# Altium PCB Side_PCB.PcbDoc
Units mm, origin at the board's own origin, x right, y up, seen from the top; angles counter-clockwise.
Board outline 42 x 20 mm, 2 copper layers (Top Layer, Bottom Layer), stack 1.448 mm thick; 12 components, 6 nets, 51 pads, 47 vias.
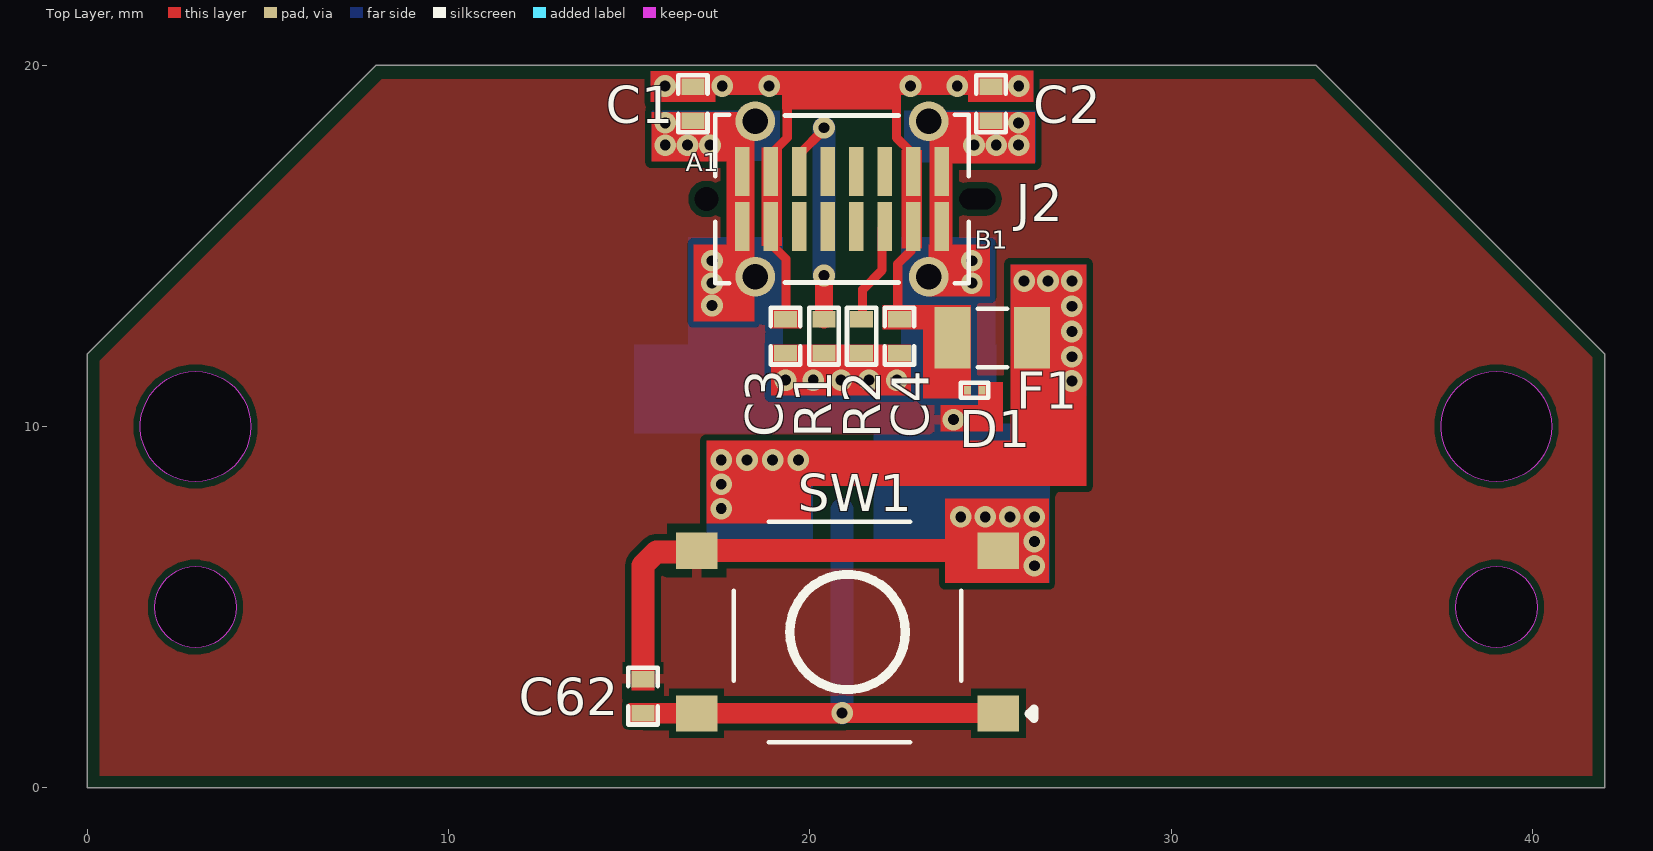
[diagram p0: Top Layer view]
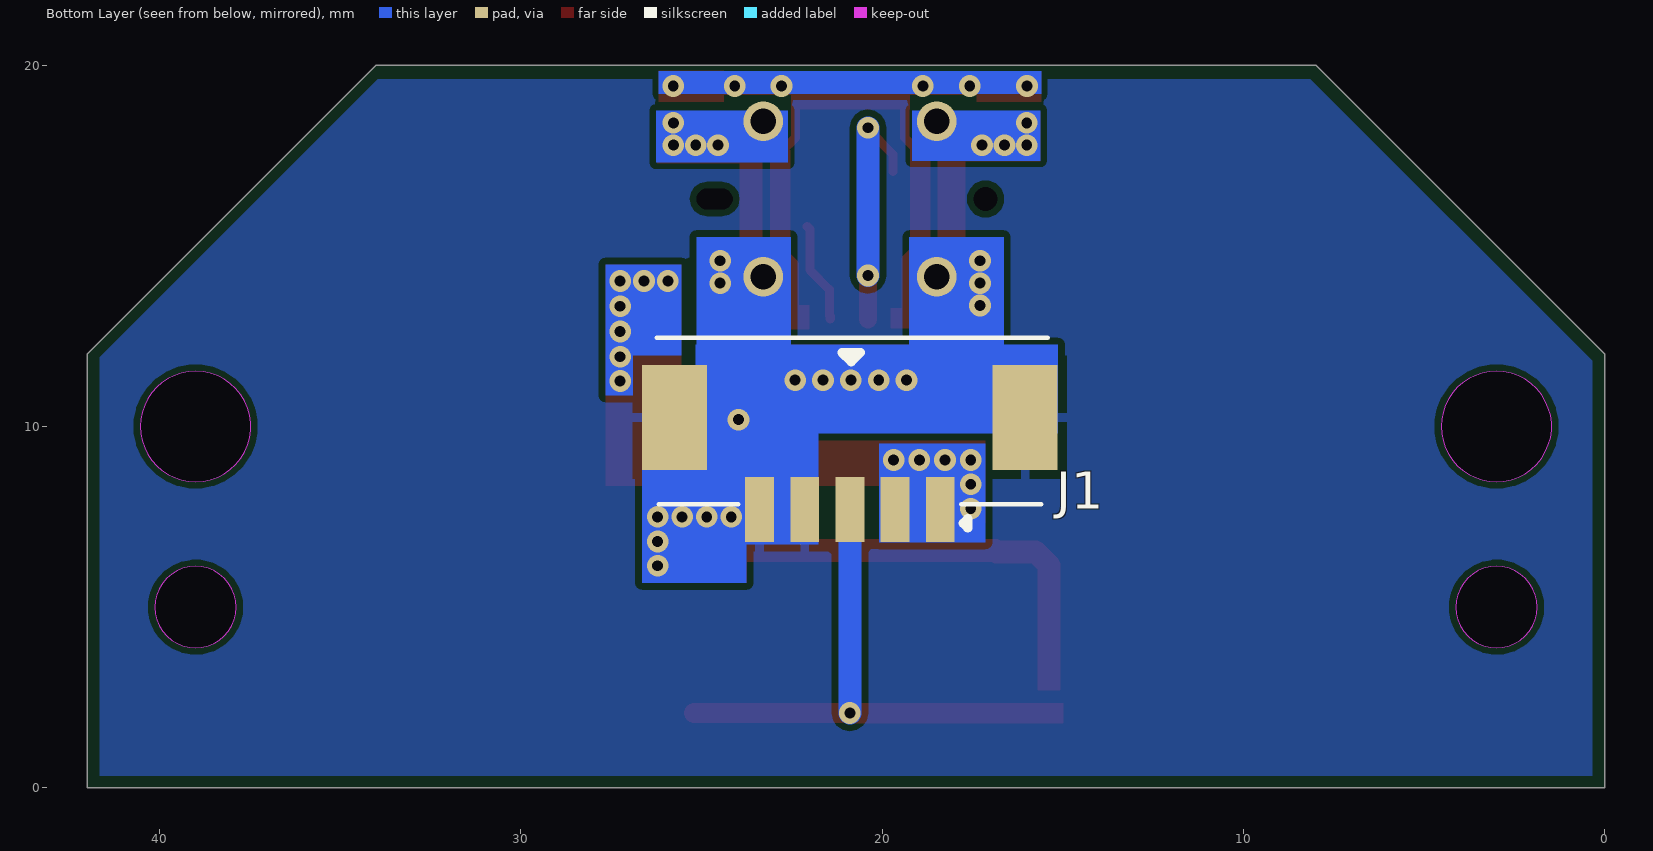
[diagram p1: Bottom Layer view, seen from below]
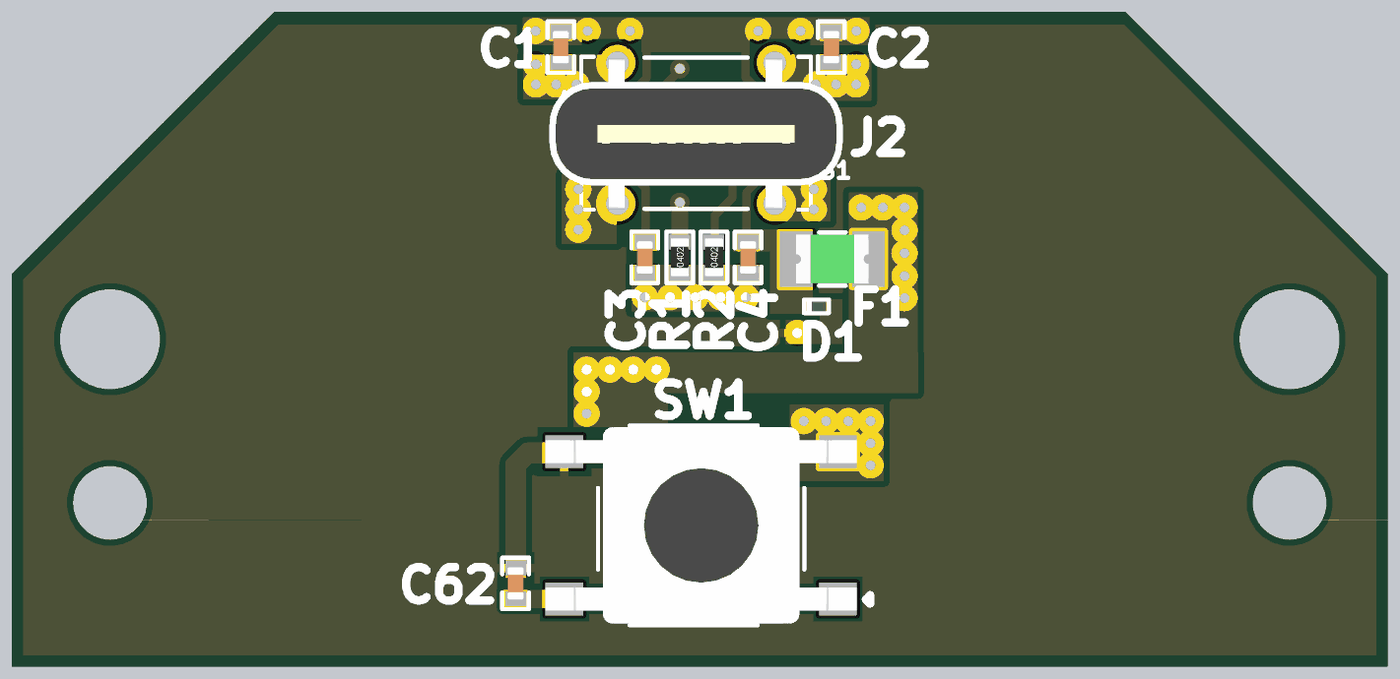
[diagram p2: 3D render of the assembled board from above, using the file's embedded part models]

## Layer stack, top to bottom
Top Solder: solder mask 0.0762, Solder Resist, Dk 3.5
Top Layer: signal copper 0.254
Dielectric 1: dielectric 0.9398, FR-4, Dk 4.8
Bottom Layer: signal copper 0.254
Bottom Solder: solder mask 0.0762, Solder Resist, Dk 3.5

## Board outline
0,0 42,0 42,12 34,20 8,20 0,12
cut-out: 39,3.873 cw(c39,5) 39,6.127 cw(c39,5) 40.127,5 cw(c39,5)
cut-out: 39,8.473 cw(c39,10) 39,11.527 cw(c39,10) 40.527,10 cw(c39,10)
cut-out: 3,3.873 cw(c3,5) 3,6.127 cw(c3,5) 4.127,5 cw(c3,5)
cut-out: 3,8.473 cw(c3,10) 3,11.527 cw(c3,10) 4.527,10 cw(c3,10)

## Design rules (kind name [scope] priority, off if disabled: settings)
Clearance [All] p1: gap=0.178 ignorepadtopadclearanceinfootprint=FALSE except(0: Arc-Hole Track-Hole SMDPad-Hole THPad-Hole Via-Hole Fill-Hole Poly-Hole Region-Hole Text-Hole; 0.102: Arc-SMDPad Track-SMDPad SMDPad-SMDPad)
ComponentClearance [All] p1: gap=0 collisioncheckmode=3 verticalgap=0 showdistances=FALSE
HoleToHoleClearance [All] p1: gap=0 allowstackedmicrovias=TRUE
MinimumSolderMaskSliver [All] p1: minsoldermaskwidth=0
PolygonConnect [All] p1: connectstyle=Relief reliefconductorwidth=0.254 reliefentries=4 polygonreliefangle="90 Angle" airgapwidth=0.254
RoutingVias [All] p1: holewidth=0.3 width=0.6 viastyle="Through Hole" minholewidth=0.3 minwidth=0.6 maxholewidth=0.3 maxwidth=0.6
SilkToSilkClearance [All] p1: silktosilkclearance=0
SilkToSolderMaskClearance [IsPad] p1: minsilkscreentomaskgap=0 clearancetoexposedcopper=TRUE
SolderMaskExpansion [All] p1: expansion=0.102 istentingtop=FALSE
Width [All] p1: maxlimit=1.016 minlimit=0.254 preferedwidth=0.559
25 further rules are at their usual default settings.

## Components (designator, comment, footprint, x,y, rotation, side; value= is the part's Value field where it differs from the comment)
C1 "1nF" Cap-0402 16.76,18.928 r270 top
C2 "1nF" Cap-0402 25.015,18.928 r270 top
C3 "1nF" Cap-0402 19.325,12.502 r270 top locked
C4 "1nF" Cap-0402 22.475,12.502 r270 top locked
C62 "100nF" Cap-0402 15.38,2.54 r270 top
D1 "PESD5V0H1BSFYL" DSN0603-2 24.561,11.003 r0 top locked
F1 "BSMD0805L-200" Fuse-0805 25.048,12.451 r0 top locked
J1 "1.25-5PWB" 1.25-5PWB 20.892,8.976 r0 bottom
J2 "918-418K2022Y40009" 918-418K2022Y40009 20.888,16.295 r0 top locked
R1 "5.1K" Res-0402 20.392,12.502 r90 top locked
R2 "5.1K" Res-0402 21.434,12.502 r90 top locked
SW1 "K2-1102SP-C4SC-04" K2-1102SP-C4SC-04 21.043,4.312 r180 top

## Footprints (in the part's own frame and the unit in brackets; to place one, negate y for a bottom-side part, rotate by r counter-clockwise, add the part's x,y. Pads: shape width x height; smd on the part's side, far side on the other; paste and mask are expansions set on the pad)
1.25-5PWB [mm]
  rect 0.8x1.8 smd: 1(-2.5,1.275) 2(-1.25,1.275) 3(0,1.275) 4(1.25,1.275) 5(2.5,1.275)
  rect 1.8x2.9 smd: MP1(-4.85,-1.275) MP2(4.85,-1.275)
  silkscreen extent -5.47,-3.47 5.35,1.78, body extent -5.5,-4.32 5.5,1.73, height 3.56
918-418K2022Y40009 [mm]
  rect 0.4x1.35 smd: A1(-2.765,0.76) A4(-1.975,0.76) A5(-1.185,0.76) A6(-0.395,0.76) A7(0.395,0.76) A8(1.185,0.76) A9(1.975,0.76) A12(2.765,0.76) B1(2.765,-0.76) B4(1.975,-0.76) B5(1.185,-0.76) B6(0.395,-0.76) B7(-0.395,-0.76) B8(-1.185,-0.76) B9(-1.975,-0.76) B12(-2.765,-0.76)
  round 0 hole 0.58 slot 1 at 0 deg unplated: MH(3.75,0)
  round 0 hole 0.66 unplated: MH2(-3.75,0)
  round 1.1 hole 0.7: S1(-2.4,2.15) S2(2.4,2.15) S3(2.4,-2.15) S4(-2.4,-2.15)
  silkscreen extent -3.51,-2.34 3.51,2.34, body extent -4.47,-2.31 4.47,2.29, height 10.56
Cap-0402 [mil]
  rect 18x25 smd mask+2.36: 1(-18.5,0) 2(18.5,0)
  silkscreen extent -31,-16 31,16, body extent -20,-10 20,10, height 19
DSN0603-2 [mm]
  rect 0.2x0.24 smd mask+0.055: 1(-0.2,0) 2(0.2,0)
  silkscreen extent -0.38,-0.2 0.38,0.2, body extent -0.3,-0.15 0.3,0.15, height 0.32
Fuse-0805 [mm]
  rect 1x1.7 smd: 1(-1.1,0) 2(1.1,0)
  silkscreen extent -0.41,-0.81 0.41,0.81, body extent -1.1,-0.75 1.1,0.75, height 1.24
K2-1102SP-C4SC-04 [mm]
  rect 1.15x1 smd: 1(-4.175,2.25) 2(4.175,2.25) 3(-4.175,-2.25) 4(4.175,-2.25)
  silkscreen extent -5.16,-3.05 3.15,3.05, body extent -4.75,-3 4.75,3, height 5.07
Res-0402 [mil]
  rect 18x25 smd mask+2.17: 1(-18.5,0) 2(18.5,0)
  silkscreen extent -32,-17 32,16, body extent -23,-11 23,11, height 16

## Part data
C1 C2 C3 C4: library part C1005C0G1E102JT000F, "CAP CER 1000PF 25V C0G 0402", LCSC Part Number=C343059, Manufacturer=TDK, Package=0402, ComponentLink1Description=LCSC, ComponentLink1URL=https://www.lcsc.com/product-detail/Multilayer-Ceramic-Capacitors-MLCC-SMD-SMT_TDK-C1005C0G1E102JT000F_C343059.html, Item Type=Capacitor, Manufacturer Part Number=C1005C0G1E102JT000F
C62: library part CC0402KRX5R8BB104, "CAP CER 0.1UF 25V X5R 0402", Case Code (Imperial)=0402, Case Code (Metric)=1005, Dielectric=X5R, LCSC Part Number=C106256, Manufacturer=Yageo, Max Operating Temperature=85°C, Min Operating Temperature=-55°C, Resistor Type=Ceramic, Supplier Part Number 1=311-1697-1-ND, Tolerance=10%, Voltage Rating=25V, Capacitance=100nF, Case/Package=0402, Category="Ceramic Capacitors", ComponentLink1Description=http://www.mouser.com/ds/2/447/UPY-GPHC_X5R_4V-to-50V_25-1131599.pdf?src-supplier=Mouser, ComponentLink1URL=http://www.mouser.com/ds/2/447/UPY-GPHC_X5R_4V-to-50V_25-1131599.pdf?src-supplier=Mouser, ComponentLink2Description=http://www.yageo.com/documents/recent/UPY-GPHC_X5R_4V-to-50V-16.pdf?src-supplier=Future+Electronics, ComponentLink2URL=http://www.yageo.com/documents/recent/UPY-GPHC_X5R_4V-to-50V-16.pdf?src-supplier=Future+Electronics, ComponentLink3Description=http://www.yageo.com/documents/recent/UPY-GPHC_X5R_4V-to-50V_25.pdf?src-supplier=Digi-Key, ComponentLink3URL=http://www.yageo.com/documents/recent/UPY-GPHC_X5R_4V-to-50V_25.pdf?src-supplier=Digi-Key, Depth=0.5mm, Halogen Free="Halogen Free", Item Type=Capacitor, Lead Free="Lead Free", Length=0.039inch, Manufacturer Part Number=CC0402KRX5R8BB104, Mount="Surface Mount", Packaging="Tape and Reel", Pricing 1="1=0.10000, 10=0.03800, 50=0.02100, 100=0.01710, 500=0.01224, 1000=0.00961, 2500=0.00874, 5000=0.00804 (USD)", RoHS=Yes, RoHS Compliant=Yes, Series=CC, Stock 1=4598218, Supplier 1=Digi-Key, Thickness=0.022inch, Voltage Rating (DC)=25V, Width=0.02inch
D1: "TVS DIODE 5VWM 6.3VC DSN0603-2", LCSC Part Number=C477989, Manufacturer=Nexperia, Category="ESD and Circuit Protection ICs", ComponentLink1Description=http://www.farnell.com/datasheets/1961312.pdf?src-supplier=Farnell, ComponentLink1URL=http://www.farnell.com/datasheets/1961312.pdf?src-supplier=Farnell, ComponentLink2Description=https://assets.nexperia.com/documents/data-sheet/PESD5V0H1BSF.pdf?src-supplier=Digi-Key, ComponentLink2URL=https://assets.nexperia.com/documents/data-sheet/PESD5V0H1BSF.pdf?src-supplier=Digi-Key, ComponentLink3Description=http://www.farnell.com/datasheets/1961312.pdf?src-supplier=Newark, ComponentLink3URL=http://www.farnell.com/datasheets/1961312.pdf?src-supplier=Newark, Item Type=Diode, Manufacturer Part Number=PESD5V0H1BSFYL, Pricing 1="18000=0.06453, 36000=0.06278, 54000=0.06104, 90000=0.05930, 180000=0.05755, 900000=0.05581, 1800000=0.05406 (USD)", RoHS=Yes, RoHS Compliant=Yes, Stock 1=9000, Supplier 1=Avnet, Supplier Part Number 1=PESD5V0H1BSFYL
F1: "6V 2A 50A 1W -40℃~+85℃ 4A 4mΩ 5s 45mΩ 0805 Resettable Fuses ROHS", LCSC Part Number=C2757931, Manufacturer=BHFUSE, Package=0805, ComponentLink1Description=LCSC, ComponentLink1URL=https://www.lcsc.com/product-detail/Resettable-Fuses_BHFUSE-BSMD0805L-200_C2757931.html, Item Type=Fuse, Manufacturer Part Number=BSMD0805L-200
J1: "1x5P 1 1.25mm Male pin 5 -25℃~+85℃ Surface Mount SMD,P=1.25mm Wire To Board / Wire To Wire Connector ROHS", LCSC Part Number=C2905012, Manufacturer=DEALON, Package=SMD,P=1.25mm, ComponentLink1Description=LCSC, ComponentLink1URL=https://www.lcsc.com/product-detail/Wire-To-Board-Wire-To-Wire-Connector_DEALON-1-25-5PWB_C2905012.html, Item Type="JST Right Angle", Manufacturer Part Number=1.25-5PWB
J2: "USB 3.1 1 Brick nogging 16 Female Type-C SMD USB Connectors ROHS", LCSC Part Number=C2763102, Manufacturer="Jing Extension", Package=Custom, ComponentLink1Description=LCSC, ComponentLink1URL=https://www.lcsc.com/product-detail/USB-Connectors_Jing-Extension-of-the-Electronic-Co-918-418K2022Y40009_C2763102.html, Item Type="USB Connector", Manufacturer Part Number=918-418K2022Y40009
R1 R2: library part RC0402FR-075K1L, "RES 5.1K OHM 1% 1/16W 0402", Case Code (Imperial)=0402, Case Code (Metric)=1005, LCSC Part Number=C137973, Manufacturer=Yageo, Max Operating Temperature=155°C, Max Power Dissipation=63mW, Min Operating Temperature=-55°C, Package Quantity=1, Resistance=5.1kR, Resistance Tolerance=1%, Resistor Type="Thick Film", Temperature Coefficient=100ppm/°C, Voltage Rating=50V, Case/Package=0402, Category="Chip SMD Resistors", ComponentLink1Description=https://datasheet.ciiva.com/7983/1018594-7983519.pdf?src-supplier=Element14, ComponentLink1URL=https://datasheet.ciiva.com/7983/1018594-7983519.pdf?src-supplier=Element14, ComponentLink2Description=https://datasheet.ciiva.com/46394/1018594-46394936.pdf?src-supplier=Element14, ComponentLink2URL=https://datasheet.ciiva.com/46394/1018594-46394936.pdf?src-supplier=Element14, ComponentLink3Description=https://datasheet.ciiva.com/2453/pyu-r-int-thick-7-2453401.pdf?src-supplier=Digi-Key, ComponentLink3URL=https://datasheet.ciiva.com/2453/pyu-r-int-thick-7-2453401.pdf?src-supplier=Digi-Key, ComponentLink4Description=https://datasheet.ciiva.com/2453/pyu-r-int-thick-7-2453402.pdf?src-supplier=Digi-Key, ComponentLink4URL=https://datasheet.ciiva.com/2453/pyu-r-int-thick-7-2453402.pdf?src-supplier=Digi-Key, ComponentLink5Description=https://datasheet.ciiva.com/2453/pyu-r-int-thick-7-2453400.pdf?src-supplier=Digi-Key, ComponentLink5URL=https://datasheet.ciiva.com/2453/pyu-r-int-thick-7-2453400.pdf?src-supplier=Digi-Key, ComponentLink6Description=https://datasheet.ciiva.com/12558/pyu-rc0402-51-rohs-l-6-r-8721-12558460.pdf?src-supplier=Mouser, ComponentLink6URL=https://datasheet.ciiva.com/12558/pyu-rc0402-51-rohs-l-6-r-8721-12558460.pdf?src-supplier=Mouser, ComponentLink7Description=https://datasheet.ciiva.com/16744/pyu-rc0402-51-rohs-l-6-r-16744283.pdf?src-supplier=Future+Electronics, ComponentLink7URL=https://datasheet.ciiva.com/16744/pyu-rc0402-51-rohs-l-6-r-16744283.pdf?src-supplier=Future+Electronics, ComponentLink8Description=https://datasheet.ciiva.com/15189/getdatasheetpartid-323636-15189493.pdf?src-supplier=Verical, ComponentLink8URL=https://datasheet.ciiva.com/15189/getdatasheetpartid-323636-15189493.pdf?src-supplier=Verical, Construction=Rectangular, Depth=0.5mm, Features="Moisture Resistant", Height=0.016inch, Item Type=Resistor, Lead Free="Lead Free", Length=1mm, Manufacturer Part Number=RC0402FR-075K1L, Military Standard=Not, Number of Terminations=2, Packaging="Tape and Reel", Power Rating=63mW, Pricing 1="10000=0.00085 (USD)", RoHS=Yes, RoHS Compliant=Yes, Series=RC, Stock 1=65000, Supplier 1=Avnet, Supplier Part Number 1=RC0402FR-075K1L, Technology="THICK FILM", Termination=SMD/SMT, Tolerance=1%, Voltage Rating (DC)=50V, Width=0.02inch, Working Voltage=50V
SW1: "-25℃~+85℃ 6mm 5mm Round Button 50mA Brick nogging 6mm SPST 100MΩ 100000 250gf@±30gf 12V SMD Tactile Switches ROHS", LCSC Part Number=C127509, Manufacturer="Korean Hroparts Elec", Package=SMD, ComponentLink1Description=LCSC, ComponentLink1URL=https://www.lcsc.com/product-detail/span-style-background-color-ff0-Tactile-span-Switches_Korean-Hroparts-Elec-K2-1102SP-C4SC-04_C127509.html, Item Type=Switch, Manufacturer Part Number=K2-1102SP-C4SC-04

## Via types
v1: diameter 0.6, hole 0.3, Top Layer to Bottom Layer, 44 vias
v2: diameter 0.6, hole 0.3, Top Layer to Bottom Layer, tented both sides, 3 vias

## Nets (pads, with @x,y where several pads share a name; then routed paths per layer and width w, separated by ;. In a path a pad name is that pad's centre, name@x,y a point inside that pad or via, vN(x,y) a via of type N, cw(c..) or ccw(c..) an arc to the next point about the centre after c; other vN are vias at no path point)
5V_USB: C1.1 C2.1 C3.1 C4.1 D1.1 F1.1 J2.A4 J2.A9 J2.B4 J2.B9 | length 13.4
  Top Layer w0.254: C1.1@17.058,19.392 C1.1@17.065,19.398 ; J2.B9 18.913,15.06 19.343,14.631 19.343,12.989 C3.1 19.414,12.972 C3.1@19.516,13.073 ; J2.A4 18.986,17.128 18.986,17.603 19.376,17.994 19.376,18.877 19.478,18.979 ; 19.638,19.385 21.434,19.385 ; 20.76,19.538 21.985,19.538 22.138,19.385 ; 22.284,13.21 22.284,13.073 22.386,12.972 C4.1 ; 22.323,18.979 22.399,18.903 22.399,17.994 22.79,17.603 22.79,17.128 J2.A9 ; 22.433,13.226 22.433,14.499 22.79,14.856 22.79,15.462 J2.B4 ; C2.1@24.71,19.398 C2.1@24.717,19.392
  other v1: 15.992,19.421 17.577,19.421 18.872,19.421 22.784,19.421 24.079,19.421 25.78,19.421
5V_USB#: F1.2 J1.1 J1.2
  other v1: 17.547,7.727 17.547,8.4 17.547,9.073 18.259,9.073 18.97,9.073 19.681,9.073 27.25,11.257 27.25,11.93 27.25,12.629 27.25,13.327 25.929,14.026 26.59,14.026 27.25,14.026
BUT_IN: C62.2 J1.3 SW1.1 SW1.2 | length 15.4
  Top Layer w0.559: C62.2@15.388,2.062 20.873,2.062 v2@20.884,2.063 ; v2(20.892,2.07) SW1.1@25.21,2.07
  Bottom Layer w0.635: v2(20.892,2.07) J1.3
GND: C1.2 C2.2 C3.2 C4.2 C62.1 D1.2 J1.4 J1.5 J1.MP1 J1.MP2 J2.A1 J2.A12 J2.B1 J2.B12 J2.S1 J2.S2 J2.S3 J2.S4 R1.1 R2.1 SW1.3 SW1.4 | length 18.1
  Top Layer w0.635: C62.1 15.38,6.155 15.752,6.527 16.833,6.527 SW1.4 SW1.3
  Bottom Layer w0.635: 18.488,11.842 J2.S4 ; 23.288,11.486 J2.S3
  other v1: 26.213,6.147 26.213,6.82 24.177,7.498 24.855,7.498 25.534,7.498 26.213,7.498 23.974,10.19 19.325,11.283 20.096,11.283 20.866,11.283 21.637,11.283 22.407,11.283 17.293,13.348 17.293,13.967 24.482,13.967 17.293,14.585 24.482,14.585 15.998,17.785 16.616,17.785 17.234,17.785 24.541,17.785 25.159,17.785 25.777,17.785 15.998,18.403 25.777,18.403
NetJ2_A5: J2.A5 R1.2 | length 6.8
  Top Layer w0.254: J2.A5 19.703,17.53 20.392,18.22 v2(20.392,18.268)
  Top Layer w0.508: R1.2 v2(20.392,14.178)
  Bottom Layer w0.635: v2(20.392,14.178) v2(20.392,18.268)
NetJ2_B5: J2.B5 R2.2 | length 2.8
  Top Layer w0.254: R2.2 21.434,13.048 21.459,13.073 21.459,13.788 22,14.329 22,15.462 J2.B5
pads on no net: J2.A6 J2.A7 J2.A8 J2.B6 J2.B7 J2.B8 J2.MH J2.MH2

## Polygon pours and split planes (outlines as drawn)
GND on Top Layer "GND_L01_P000" (solid, remove dead copper, pour order 0): 0.352,11.816 8.149,19.614 33.956,19.614 41.652,11.918 41.652,0.335 0.352,0.335
GND on Bottom Layer "GND_L02_P001" (solid, remove dead copper, pour order 1): 0.352,11.816 8.149,19.614 33.956,19.614 41.652,11.918 41.652,0.335 0.352,0.335

## Other copper
Top Layer:
  rectangle net 5V_USB: 18.656,14.997 19.233,17.727
  rectangle net GND: 15.062,2.692 15.697,3.327
  rectangle net BUT_IN: 14.986,1.783 15.545,2.342
  rectangle net 5V_USB#: 17.141,7.315 20.037,9.606
  rectangle net 5V_USB: 22.533,14.924 23.11,17.654
  region net GND: 18.462,17.963 17.7,17.963 17.7,14.864 18.462,14.864
  rectangle net GND: 23.313,14.864 23.948,17.963
  rectangle net GND: 23.745,5.664 26.615,8.006
  rectangle net 5V_USB#: 25.548,8.489 27.657,14.483
  rectangle net 5V_USB#: 17.141,8.357 27.661,9.606
  region net GND: 24.99,15.042 23.288,15.042 23.288,13.594 24.99,13.594
  rectangle net GND: 16.785,12.908 18.462,15.042
  region net GND: 26.234,17.277 26.234,18.699 23.466,18.699 23.466,17.277
  region net 5V_USB: 26.183,18.982 26.183,19.846 24.377,19.846 24.377,18.982
  rectangle net GND: 23.618,9.86 25.142,10.597
  rectangle net GND: 24.659,9.86 25.345,11.232
  rectangle net 5V_USB: 19.224,18.776 22.526,19.385
  region net 5V_USB: 24.456,19.177 24.456,19.842 17.065,19.842 17.065,19.177
  region net GND: 18.36,17.328 18.36,18.699 15.617,18.699 15.617,17.328
  region net 5V_USB: 17.395,18.979 17.395,19.842 15.592,19.842 15.592,18.979
  rectangle net GND: 18.919,10.851 22.805,12.273
  rectangle net 5V_USB: 18.927,12.705 19.765,13.284
  rectangle net 5V_USB: 22.011,12.68 24.456,13.365
  rectangle net 5V_USB: 23.135,10.775 24.456,13.365
Bottom Layer:
  rectangle net GND: 23.749,5.664 26.645,7.798
  rectangle net 5V_USB#: 26.895,10.851 27.657,12.349
  rectangle net GND: 21.764,6.736 26.645,10.089
  rectangle net 5V_USB#: 17.141,6.787 20.087,9.53
  rectangle net 5V_USB#: 25.548,11.968 27.657,14.483
  region net GND: 26.26,17.302 26.26,18.75 22.602,18.75 22.602,17.302
  region net GND: 19.173,17.353 19.173,18.75 15.617,18.75 15.617,17.353
  region net GND: 19.25,15.245 16.634,15.245 16.634,11.943 19.25,11.943
  rectangle net GND: 22.526,11.943 25.142,15.245
  region net 5V_USB: 26.183,19.202 26.183,19.842 15.592,19.842 15.592,19.202
  rectangle net GND: 15.134,9.809 25.167,12.273

## Silkscreen, mask and mechanical layers (free items; w line width, h text height)
Dimension:
  lines w0.013: 16.5,15.75 ccw(c17.55,15.75) 17.55,14.7 24.45,14.7 ccw(c24.45,15.75) 25.5,15.75 25.5,16.85 ccw(c24.45,16.85) 24.45,17.9 17.55,17.9 ccw(c17.55,16.85) 16.5,16.85 16.5,15.75 ; 16.8,15.75 ccw(c17.55,15.75) 17.55,15 24.45,15 ccw(c24.45,15.75) 25.2,15.75 25.2,16.85 ccw(c24.45,16.85) 24.45,17.6 17.55,17.6 ccw(c17.55,16.85) 16.8,16.85 16.8,15.75 ; 18.05,1.3 18.05,7.3 24.05,7.3 24.05,1.3 18.05,1.3 ; 19.3,4.3 cw(c21.05,4.3) 22.8,4.3 cw(c21.05,4.3) 19.3,4.3
Board Outline:
  lines w0.254: 0,0 41.982,0 41.982,12.045 34.027,20 8,20 0,12 0,0 ; 3,4 ccw(c3,5) 3,6 ccw(c3,5) 3,4 ; 3,8.6 cw(c3,10) 3,11.4 cw(c3,10) 3,8.6 ; 39,4 cw(c39,5) 39,6 cw(c39,5) 39,4 ; 39,8.6 ccw(c39,10) 39,11.4 ccw(c39,10) 39,8.6

## Dimensions
8,20 to 34.027,20 on Dimension
8,20 to 0,12 on Dimension
0,12 to 0,0 on Dimension
0,0 to 41.982,0 on Dimension

## Text inside footprints (layer, text, board x,y; h text height)
J2: Top Overlay "B1" at 24.568,14.924 h0.5; Top Overlay "A1" at 16.57,17.057 h0.5